# Altium PCB FullSheetOLD.PcbDoc (part 3 of 8)
Units mm, origin at the board's own origin, x right, y up, seen from the top; angles counter-clockwise.
Board outline 132.46 x 194.44 mm, 4 copper layers (Top Copper, L2_GND, L3_PWR_SIG, Bottom Copper), stack 1.586 mm thick; 495 components, 210 nets, 2171 pads, 1027 vias.
Unrouted connection lines stored in the file: 53.
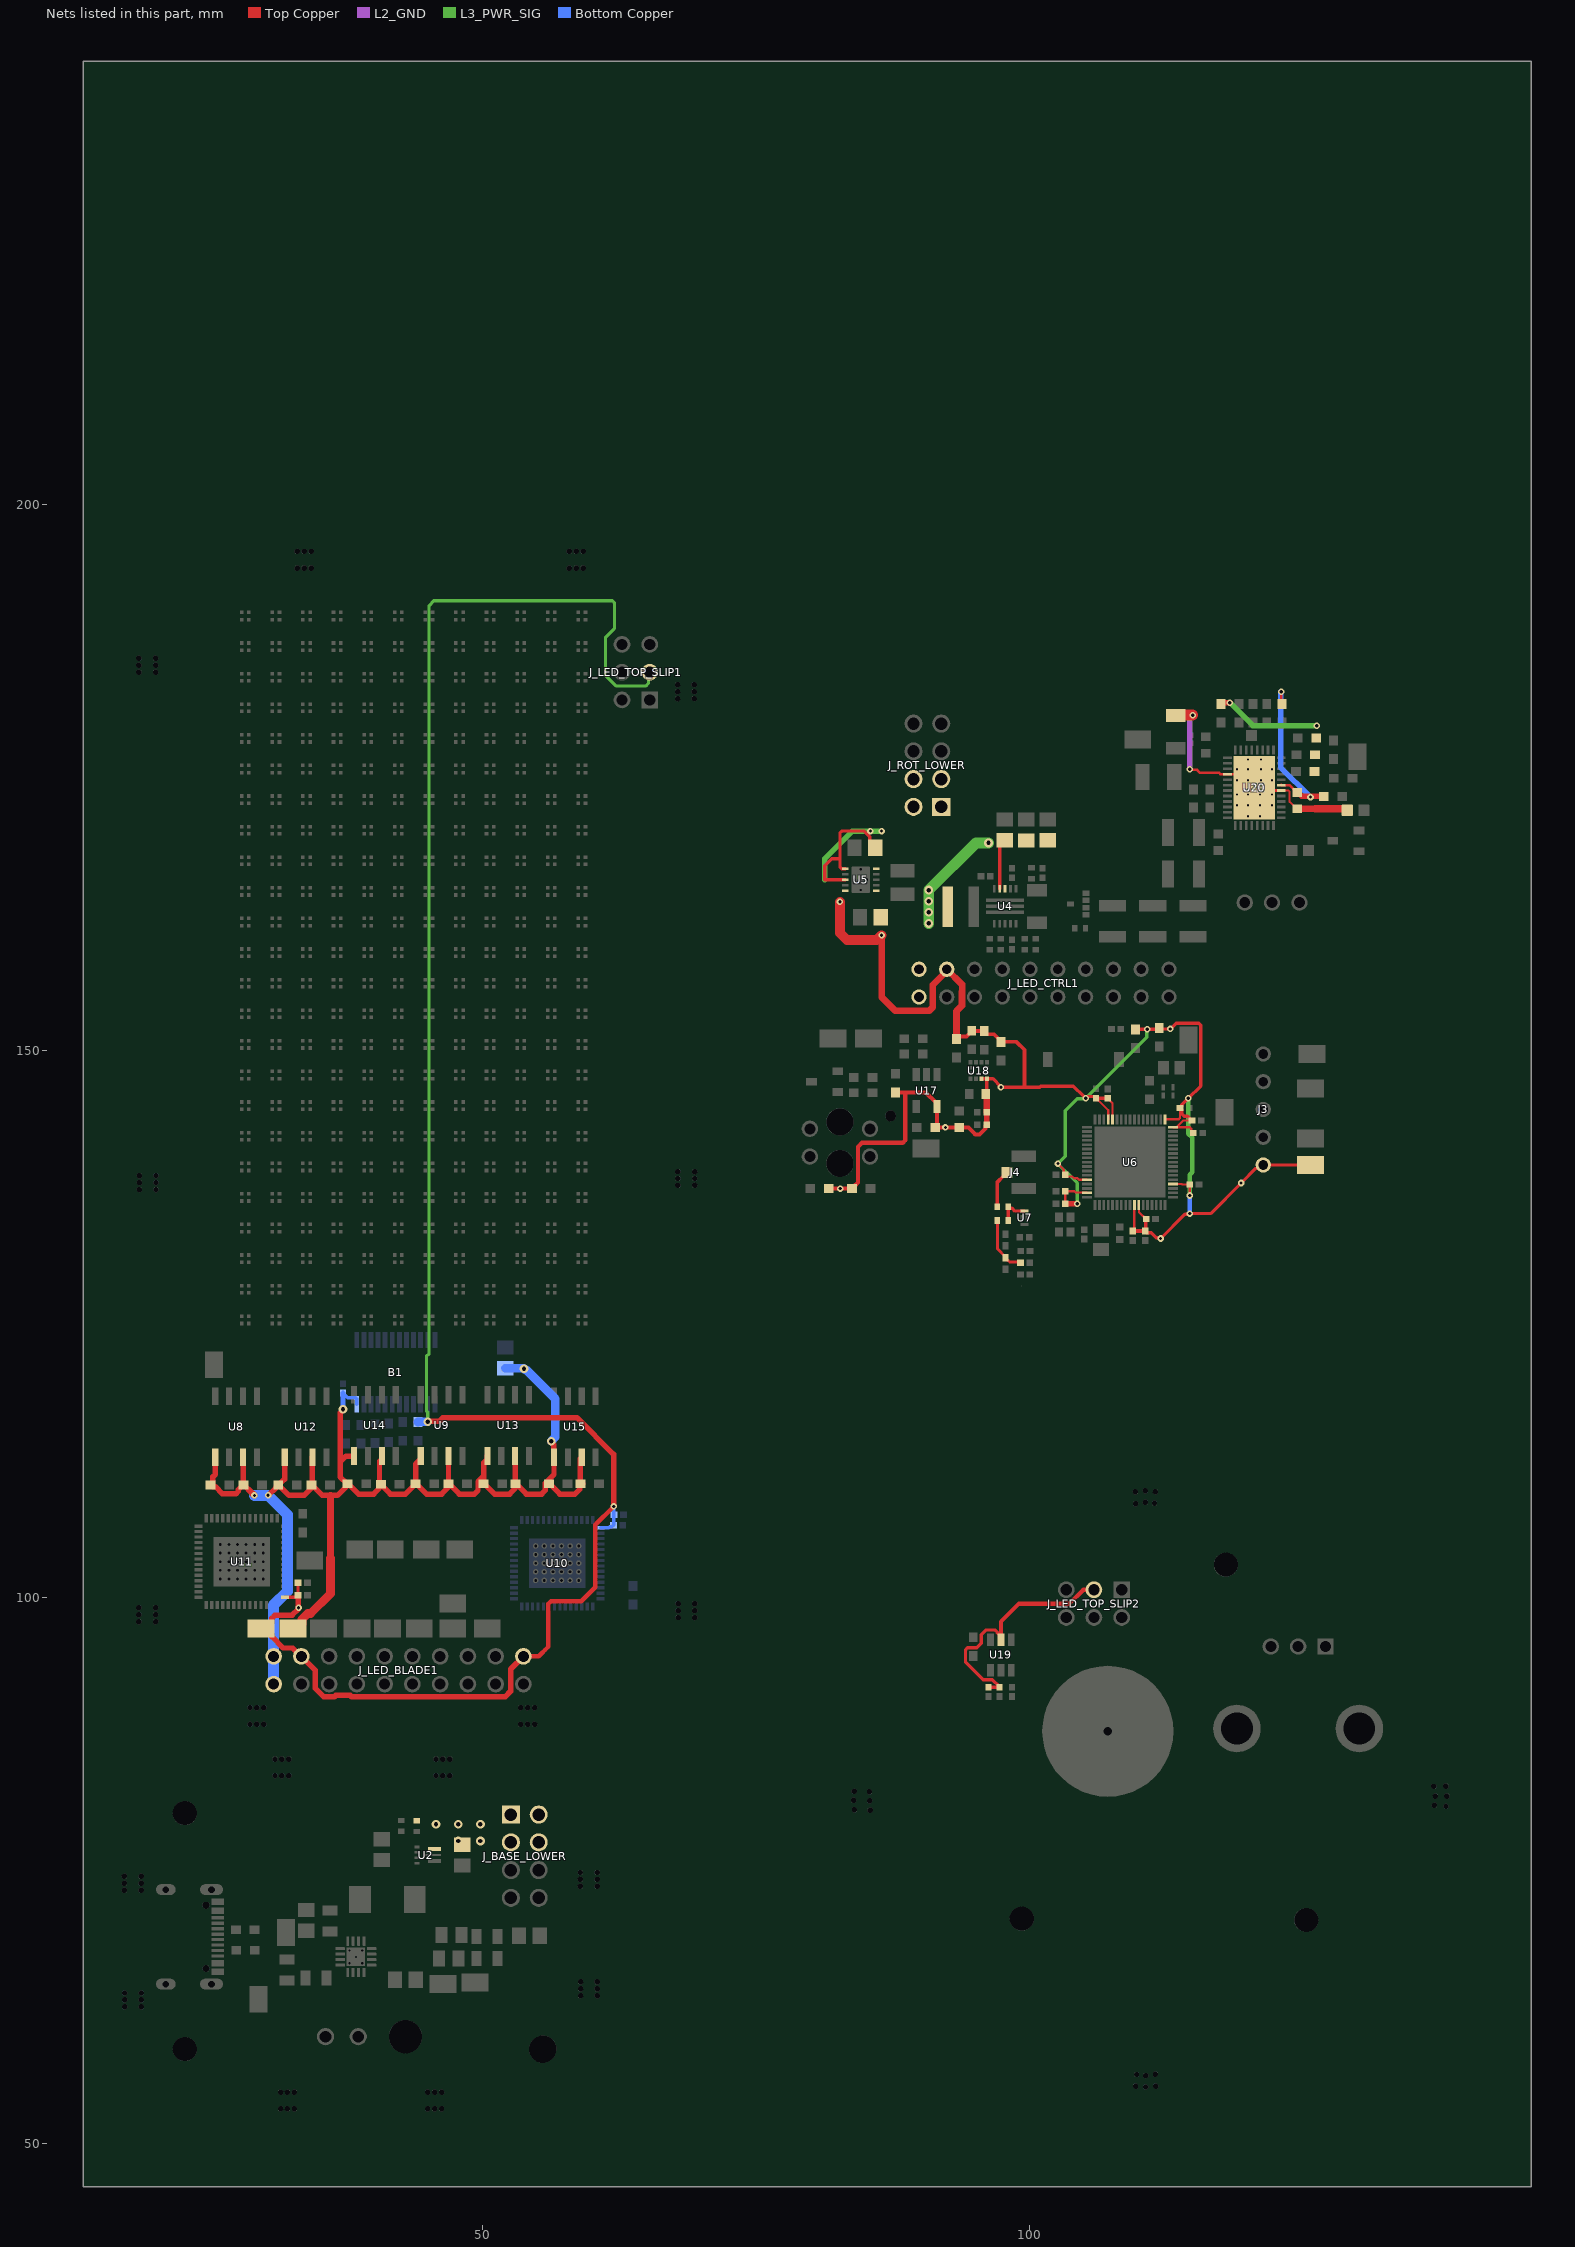
[diagram p4: the nets of this part, all layers, seen from the top]

## Via types
v1: diameter 0.6, hole 0.3, Top Copper to Bottom Copper, 857 vias
v2: diameter 0.8, hole 0.4, Top Copper to Bottom Copper, 91 vias
v3: diameter 0.4, hole 0.2, Top Copper to Bottom Copper, 79 vias

## Nets (pads, with @x,y where several pads share a name; then routed paths per layer and width w, separated by ;. In a path a pad name is that pad's centre, name@x,y a point inside that pad or via, vN(x,y) a via of type N, cw(c..) or ccw(c..) an arc to the next point about the centre after c; other vN are vias at no path point) (continued)
AVDD: (continued)
  Bottom Copper w0.5: v1(123.063,182.88) 123.063,182.853 123.005,182.794 123.005,175.953 v1(125.73,173.228)